# Altium PCB NB3000XN.PcbDoc (part 23 of 71)
Units mil, origin at the board's own origin, x right, y up, seen from the top; angles counter-clockwise.
Board outline 9527.56 x 6929.77 mil, 6 copper layers (Top Layer, GND+SHIELD, MidLayer1, MidLayer2, P2 - 3V3+5V0, Bottom Layer), stack 62.375 mil thick; 832 components, 1027 nets, 4655 pads, 4981 vias.
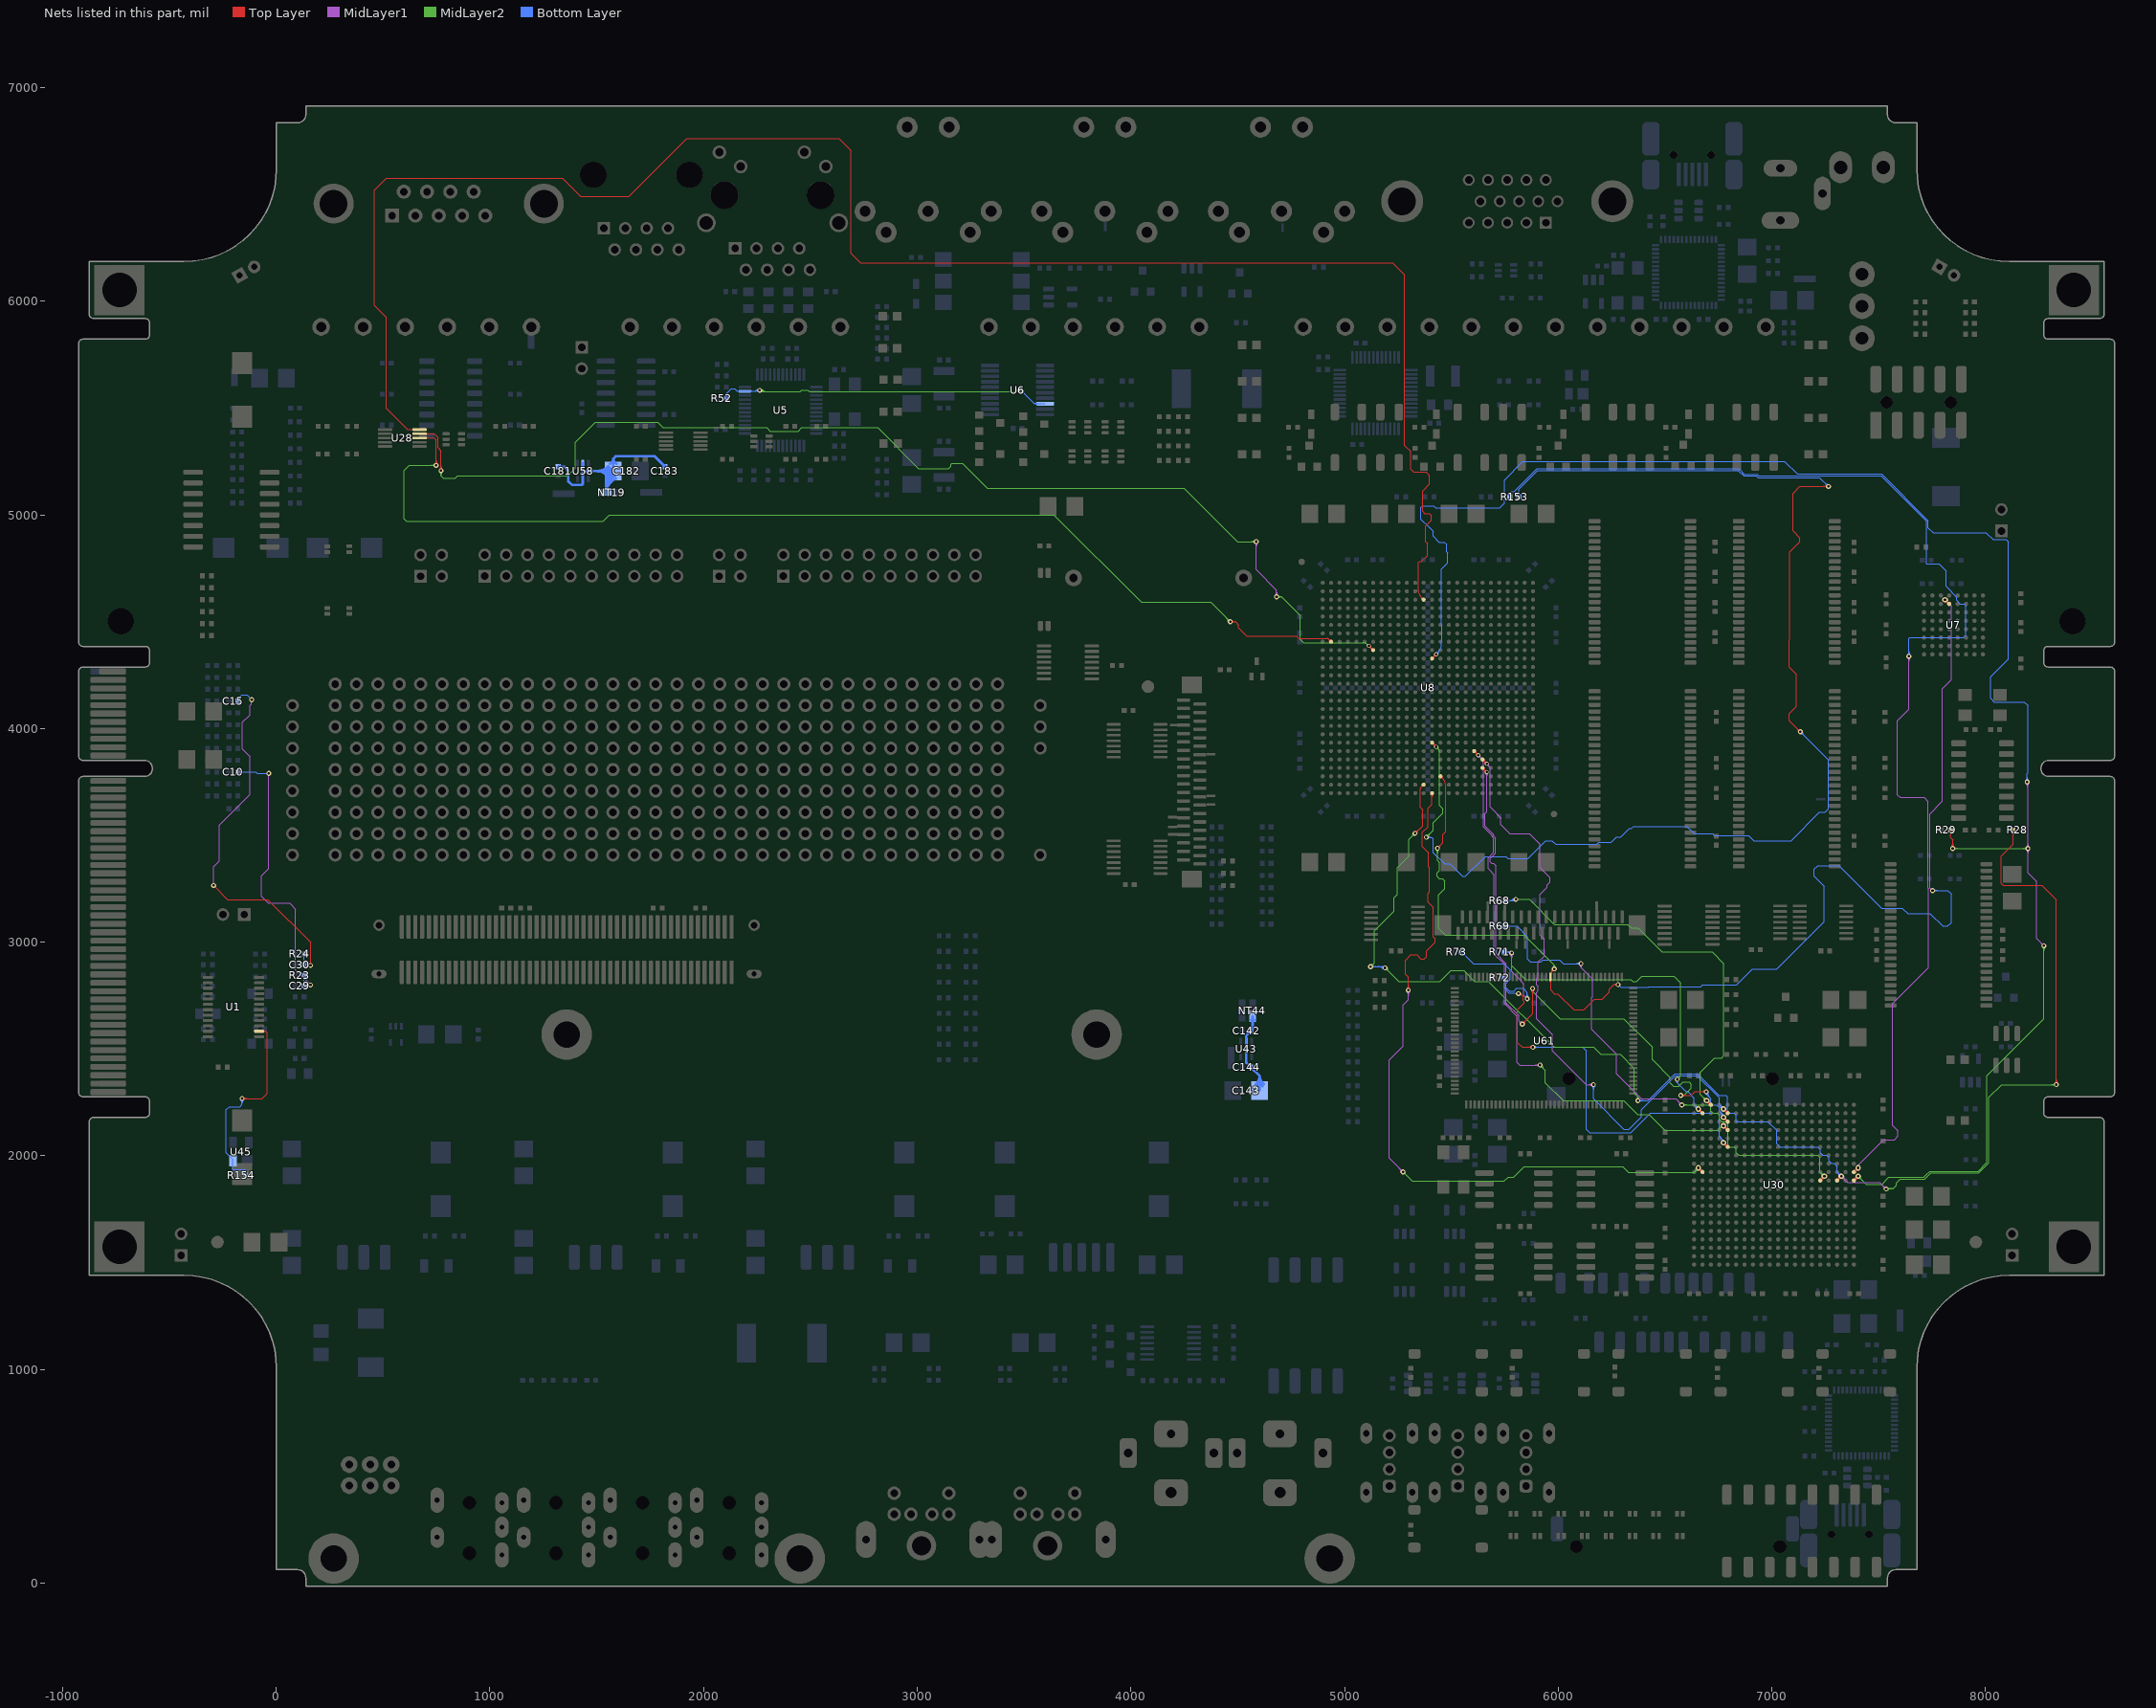
[diagram p27: the nets of this part, all layers, seen from the top]

## Via types
v1: diameter 23, hole 11.81, Top Layer to Bottom Layer, 3672 vias
v2: diameter 26, hole 11.81, Top Layer to Bottom Layer, 461 vias
v3: diameter 19, hole 11.81, Top Layer to Bottom Layer, tented both sides, 396 vias
v4: diameter 23.62, hole 11.81, Top Layer to Bottom Layer, 288 vias
v5: diameter 20, hole 11.81, Top Layer to Bottom Layer, 91 vias
v6: diameter 23, hole 11.81, Top Layer to Bottom Layer, tented both sides, 50 vias
v7: diameter 31, hole 11.81, Top Layer to Bottom Layer, 15 vias
v8: diameter 27.56, hole 11.81, Top Layer to Bottom Layer, tented both sides, 4 vias
v9: diameter 29, hole 11.81, Top Layer to Bottom Layer, 3 vias
v10: diameter 21, hole 11.81, Top Layer to Bottom Layer, 1 vias

## Nets (pads, with @x,y where several pads share a name; then routed paths per layer and width w, separated by ;. In a path a pad name is that pad's centre, name@x,y a point inside that pad or via, vN(x,y) a via of type N, cw(c..) or ccw(c..) an arc to the next point about the centre after c; other vN are vias at no path point) (continued)
CODEC_AUD.L: C10.2 C29.1 R23.1 | length 1510.1
  MidLayer1 w4: v1(-35,3790) -35.7,3790 -35.81,3789.89 -35.81,3344.19 -69.25,3310.75 -69.25,3214.25 -37.69,3182.69 62.31,3182.69 90.19,3154.81 90.19,2870.71 v1(160.86,2800.04)
  Bottom Layer w4: C10.2@-179.33,3795.91 -95,3795.91 -89.09,3790 v1(-35,3790) ; C29.1@130.67,2795 C29.1@131.18,2795.51 ; R23.1@130.67,2844.49 R23.1@131.18,2845 C29.1@131.18,2795.51 ; C29.1@132.1,2793.89 cw(c144.6,2784.27) 144.6,2800.04 ; C29.1@135.27,2791.45 cw(c152.73,2778.01) v1@152.73,2800.04 ; C29.1@137.61,2801.94 ccw(c142.19,2806.52) C29.1@142.19,2800.04 ; C29.1@138.44,2789.01 cw(c160.86,2771.75) v1(160.86,2800.04) 135.71,2800.04 C29.1@131.18,2795.51 ; v1@154.14,2793.32 ccw(c137.92,2777.11) 137.92,2800.04 ccw(c137.92,2822.98) v1@154.14,2806.76 ; v1@156.97,2796.15 ccw(c147.58,2786.76) 147.58,2800.04 ccw(c147.58,2813.32) v1@156.97,2803.93
CODEC_AUD.R: C15.2 C30.1 R24.1 | length 1882
  Top Layer w4: v1(-293.14,3265.71) -227.44,3200 -40,3200 160.86,2999.14 v1(160.86,2891.71)
  MidLayer1 w4: v1(-293.14,3265.71) -293.14,3353.62 -266.31,3380.45 -266.31,3548.69 -122.48,3692.52 -122.48,3869.56 -138.29,3885.37 ; -138.66,3885.37 -157.48,3904.19 -157.48,4029.34 -123,4063.82 -123,4107.81 -116.52,4114.29 v1@-116.52,4135
  Bottom Layer w4: C15.2@-179.33,4128.64 -179.33,4138.55 -160.94,4156.94 -136.94,4156.94 v1(-115,4135) ; R24.1@130.67,2944.49 R24.1@131.18,2945 131.18,2895.51 C30.1@130.67,2895 ; C30.1@140.11,2895 cw(c140.11,2871.62) v1@156.91,2887.88 ; 145.87,2895 ccw(c145.87,2906.69) v1@154.14,2898.43 ; 149.55,2895 cw(c149.55,2880.76) v1@159.78,2890.66 ; v1@154.03,2885.1 ccw(c130.67,2862.49) C30.1@130.67,2895 ; v1(160.86,2891.71) 157.56,2895 C30.1@130.67,2895
CODEC_RST: R154.1 U1.14 U45.2 | length 1071.8
  Top Layer w4: v1(-159.81,2268.37) -66.63,2268.37 -43.14,2291.86 -43.14,2575.03 -51.14,2583.03 U1.14@-79.84,2583.03 ; v1@-155.92,2264.49 cw(c-146.53,2255.1) -146.53,2268.37 cw(c-146.53,2281.65) v1@-155.92,2272.26 ; v1@-153.09,2261.66 cw(c-136.87,2245.44) -136.87,2268.37 cw(c-136.87,2291.31) v1@-153.09,2275.09 ; U1.14@-60.1,2579.43 cw(c-51.42,2570.75) -51.42,2583.03 cw(c-51.42,2595.31) U1.14@-60.1,2586.63
  Bottom Layer w4: v1@-166.53,2261.66 cw(c-182.74,2245.44) -159.81,2245.44 cw(c-136.87,2245.44) v1@-153.09,2261.66 ; v1@-163.7,2264.49 cw(c-173.09,2255.1) -159.81,2255.1 cw(c-146.53,2255.1) v1@-155.92,2264.49 ; v1(-159.81,2268.37) -159.81,2240 -169.81,2230 -220,2230 -235,2215 -235,2015 -202.85,1982.85 U45.2@-202.85,1976.69 -202.85,1937.85 -200,1935 -146.32,1935 -141.32,1930 R154.1@-141.32,1910
COMA: C142.1 C143.2 C144.1 NT44.2 U43.2 | length 667.1
  Bottom Layer w12: C144.1@4555.84,2415 ccw(c4541.81,2415) 4551.73,2424.92 ccw(c4561.65,2434.84) C144.1@4561.65,2420.81 ; C142.1@4555.84,2585 cw(c4541.81,2585) 4551.73,2575.08 cw(c4561.65,2565.16) C142.1@4561.65,2579.19 ; C142.1@4557.54,2589.11 ccw(c4528.04,2618.61) 4569.76,2618.61 ; C144.1@4561.65,2409.19 cw(c4561.65,2395.16) 4571.57,2405.08 cw(c4581.49,2415) C144.1@4567.46,2415 ; NT44.2@4562.87,2636.75 cw(c4546.23,2620.11) 4569.76,2620.11 cw(c4593.3,2620.11) NT44.2@4576.66,2636.75 ; NT44.2@4569.76,2653.9 4569.76,2593.11 C142.1@4561.65,2585 4540,2563.35 U43.2@4540,2537.4 4540,2436.65 C144.1@4561.65,2415 4602.99,2373.66 ; C143.2@4583.64,2336.12 ccw(c4556.91,2373.66) 4602.99,2373.66 ; C143.2@4590.6,2326.35 ccw(c4573.48,2350.38) 4602.99,2350.38 ccw(c4632.5,2350.38) C143.2@4615.39,2326.35 ; C143.2@4602.99,2305 4602.99,2373.66 ; C143.2@4622.35,2336.12 cw(c4649.07,2373.66) 4602.99,2373.66
COMB: C181.1 C182.2 C183.1 NT19.2 U58.2 | length 1566.9
  Bottom Layer w12: C181.1@1320,5225.67 1349.33,5225.67 1366.58,5208.42 1366.58,5158.42 1385,5140 1430,5140 1435,5145 1435,5205 ; C181.1@1324.11,5221.56 cw(c1334.03,5211.64) 1334.03,5225.67 cw(c1334.03,5239.7) C181.1@1324.11,5229.78 ; U58.2@1435,5242.4 1435,5205 ; NT19.2@1537,5112.13 ccw(c1520.36,5128.77) 1543.9,5128.77 ccw(c1567.43,5128.77) NT19.2@1550.79,5112.13 ; NT19.2@1543.9,5099.52 cw(c1620.99,5099.52) C182.2@1590.64,5170.39 ; NT19.2@1543.9,5105.24 1543.9,5171.4 C182.2@1577.5,5205 ; NT19.2@1543.9,5117.71 cw(c1613.2,5117.71) C182.2@1585.91,5181.42 ; 1543.9,5135.91 cw(c1605.41,5135.91) C182.2@1581.19,5192.45 ; 1543.9,5154.1 cw(c1597.61,5154.1) C182.2@1576.46,5203.48 ; C182.2@1543.9,5172.3 cw(c1589.82,5172.3) C182.2@1571.74,5214.51 ; C182.2@1553.9,5181.4 ccw(c1496.94,5124.44) 1496.94,5205 ccw(c1496.94,5285.56) C182.2@1553.9,5228.6 ; C182.2@1562.39,5189.89 ccw(c1525.91,5153.41) 1525.91,5205 ccw(c1525.91,5256.59) C182.2@1562.39,5220.11 ; C182.2@1562.79,5238.89 ccw(c1551.2,5262.5) 1577.5,5262.5 ccw(c1603.8,5262.5) C182.2@1592.21,5238.89 ; C183.1@1814.19,5225.67 ccw(c1800.16,5225.67) 1810.08,5235.59 ccw(c1820,5245.51) C183.1@1820,5231.48 ; C183.1@1820,5225.67 1770.67,5275 1590,5275 1577.5,5262.5 C182.2@1577.5,5205 1435,5205
CRS_U: R52.1 U5.23 U6.8 | length 1968.1
  MidLayer2 w4: v1(2262.86,5583.71) 2269.06,5577.5 2452.25,5577.5 2459.27,5584.52 2488.69,5584.52 2495.71,5577.5 3478.65,5577.5 v1(3484.86,5583.71) ; v1@2263.92,5584.77 ccw(c2281.47,5602.32) 2281.47,5577.5 ; v1@2266.75,5587.6 ccw(c2291.12,5611.97) 2291.12,5577.5 ; v1@2269.57,5590.43 ccw(c2300.78,5621.63) 2300.78,5577.5 ; 3446.94,5577.5 ccw(c3446.94,5621.63) v1@3478.14,5590.43 ; 3456.59,5577.5 ccw(c3456.59,5611.97) v1@3480.97,5587.6 ; 3466.25,5577.5 ccw(c3466.25,5602.32) v1@3483.8,5584.77
  Bottom Layer w4: R52.1@2100.04,5552.5 ccw(c2088.21,5566.03) 2106.18,5566.03 ; R52.1@2102.68,5549.49 ccw(c2095.92,5557.22) 2106.18,5557.22 ccw(c2116.44,5557.21) R52.1@2109.68,5549.49 ; R52.1@2106.18,5545 2106.18,5566.03 ; R52.1@2112.32,5552.5 cw(c2124.16,5566.03) 2106.18,5566.03 ; U5.23@2167.19,5575.75 ccw(c2160.36,5568.93) 2160.36,5578.58 ccw(c2160.36,5588.24) U5.23@2167.19,5581.41 ; U5.23@2219.9,5575.75 cw(c2226.73,5568.93) 2226.73,5578.58 cw(c2226.73,5588.24) U5.23@2219.9,5581.41 ; 2227.55,5578.58 ccw(c2227.55,5619.02) v1@2256.14,5590.43 ; 2237.21,5578.58 ccw(c2237.21,5609.36) v1@2258.97,5587.6 ; 2246.86,5578.58 ccw(c2246.86,5599.7) v1@2261.8,5584.77 ; 2252.29,5578.58 cw(c2252.29,5573.15) v1@2256.14,5576.99 ; v1(2262.86,5583.71) 2257.73,5578.58 U5.23@2193.54,5578.58 2156.86,5578.58 2145.4,5590.04 2130.19,5590.04 2106.18,5566.03 ; v1@3484.86,5574.21 cw(c3484.86,5551.27) 3501.07,5567.49 cw(c3517.29,5583.71) v1@3494.36,5583.71 ; v1@3484.86,5578.21 cw(c3484.86,5564.93) 3494.25,5574.32 cw(c3503.64,5583.71) v1@3490.36,5583.71 ; v1(3484.86,5583.71) 3547.54,5521.02 U6.8@3598.94,5521.02 ; U6.8@3560.62,5516.17 ccw(c3548.91,5504.47) 3548.91,5521.02 ccw(c3548.92,5537.58) U6.8@3560.62,5525.87
DAC.CLK: U8.C13 U28.10 | length 8540.9
  Top Layer w4: U28.10@640.42,5396.54 ccw(c633.59,5389.71) 633.59,5399.37 ccw(c633.59,5409.03) U28.10@640.42,5402.2 ; U28.10@670.71,5399.37 615,5399.37 515,5499.37 515,5925 460,5980 460,6520 515,6575 1340,6575 1425,6490 1650,6490 1922,6762 2633,6762 2690,6705 2690,6225 2735,6180 5225,6180 5281.86,6123.14 5281.86,5325.04 5309.86,5297.04 5309.86,5294 ; 5309.86,5250.04 5309.86,5294 ; U8.C13@5362.97,4603.39 ccw(c5345.25,4603.39) 5357.78,4615.92 ; U8.C13@5370.31,4610.73 cw(c5370.31,4628.45) 5357.78,4615.92 ; 5309.86,5294 5309.86,5214.14 5323.96,5200.04 5381.86,5200.04 5398.52,5183.37 5398.52,5145.71 5365.19,5112.37 5365.19,5016.71 5375.52,5006.37 5398.52,5006.37 5406.86,4998.04 5406.86,4975.04 5379.19,4947.37 5379.19,4875.04 5387.5,4866.73 5387.5,4810.06 5360.44,4783 5350,4783 5346.45,4779.45 5346.45,4773 5346.45,4724.74 5346.45,4720 5346.45,4710 5346.45,4643.27 ccw(c5385.13,4643.27) 5357.78,4615.92
DAC.CS: U8.J7 U28.9 | length 5946.3
  Top Layer w4: U28.9@670.71,5379.69 740.31,5379.69 756.86,5363.14 756.86,5314.71 771.52,5300.04 v1(771.52,5207.37) ; U28.9@701,5376.86 cw(c707.83,5370.03) 707.83,5379.69 cw(c707.83,5389.34) U28.9@701,5382.51 ; v1@764.81,5214.09 ccw(c748.59,5230.31) 771.52,5230.31 ccw(c794.46,5230.31) v1@778.24,5214.09 ; v1@767.64,5211.26 ccw(c758.25,5220.65) 771.52,5220.65 ccw(c784.8,5220.65) v1@775.41,5211.26 ; v3(5114.41,4386.85) U8.J7@5134.09,4367.17 ; U8.J7@5126.59,4367.17 ccw(c5108.49,4367.17) 5121.29,4379.97 ccw(c5134.09,4392.77) U8.J7@5134.09,4374.67 ; U8.J7@5126.75,4367.17 ccw(c5109.03,4367.17) 5121.56,4379.7 ccw(c5134.09,4392.23) U8.J7@5134.09,4374.51 ; 5127.21,4374.05 ccw(c5114.41,4361.24) 5114.41,4379.35 cw(c5114.41,4361.24) 5127.21,4374.05 ; 5127.21,4374.05 cw(c5140.02,4386.85) 5121.91,4386.85 ccw(c5140.02,4386.85) 5127.21,4374.05
  MidLayer1 w4: v1@4580.14,4868.32 cw(c4563.92,4852.11) 4586.86,4852.11 cw(c4609.79,4852.11) v1@4593.57,4868.32 ; v1@4582.97,4871.15 cw(c4573.58,4861.76) 4586.86,4861.76 cw(c4600.14,4861.76) v1@4590.75,4871.15 ; v1(4586.86,4875.04) 4586.86,4743.39 4681.86,4648.39 v1(4681.86,4616.71) ; v1@4675.14,4623.43 ccw(c4658.92,4639.64) 4681.86,4639.64 ccw(c4704.79,4639.64) v1@4688.57,4623.43 ; v1@4677.97,4620.6 ccw(c4668.58,4629.99) 4681.86,4629.99 ccw(c4695.14,4629.99) v1@4685.75,4620.6
  MidLayer2 w4: v1@764.81,5200.66 cw(c748.59,5184.44) 771.52,5184.44 cw(c794.46,5184.44) v1@778.24,5200.66 ; v1@767.64,5203.49 cw(c758.25,5194.1) 771.52,5194.1 cw(c784.8,5194.1) v1@775.41,5203.49 ; v1(771.52,5207.37) 771.52,5183.48 782.72,5172.28 837.28,5172.28 848.71,5183.71 1365.02,5183.71 1400,5218.69 1400,5340.2 1493.5,5433.71 1786.29,5433.71 1810,5410 2294.81,5410 2312.62,5392.19 2443.04,5392.19 2459.39,5408.54 2815.03,5408.54 3006.38,5217.19 3147.38,5217.19 3157.81,5227.62 3157.81,5235.84 3163.68,5241.71 3211.98,5241.71 3328.65,5125.04 4248.52,5125.04 4498.52,4875.04 v1(4586.86,4875.04) ; v1@4580.14,4868.32 ccw(c4563.92,4852.11) 4563.92,4875.04 ccw(c4563.92,4897.98) v1@4580.14,4881.76 ; v1@4582.97,4871.15 ccw(c4573.58,4861.76) 4573.58,4875.04 ccw(c4573.58,4888.32) v1@4582.97,4878.93 ; v1(4681.86,4616.71) 4705.19,4616.71 4770.79,4551.11 4792,4529.9 4792,4418 4807.64,4402.36 4860,4402.36 4870,4402.36 4997.36,4402.36 5090.9,4402.36 cw(c5090.9,4388.31) 5100.83,4398.24 ; v1@4685.75,4612.82 cw(c4695.14,4603.43) 4695.14,4616.71 cw(c4695.14,4629.99) v1@4685.75,4620.6 ; v1@4688.57,4609.99 cw(c4704.79,4593.77) 4704.79,4616.71 cw(c4704.79,4639.64) v1@4688.57,4623.43 ; v3@5106.94,4386.2 ccw(c5088.9,4384.62) 5100.54,4398.49 ccw(c5112.18,4412.36) v3@5113.76,4394.32
DAC.DIN: U8.H2 U28.8 | length 5482.2
  Top Layer w4: U28.8@698.18,5360 U28.8@676.2,5360 ; U28.8@701,5357.17 cw(c707.83,5350.34) 707.83,5360 cw(c707.83,5369.66) U28.8@701,5362.83 ; v1@741.81,5238.76 ccw(c725.59,5254.98) 748.52,5254.98 ccw(c771.46,5254.98) v1@755.24,5238.76 ; v1@744.64,5235.93 ccw(c735.25,5245.32) 748.52,5245.32 ccw(c761.8,5245.32) v1@752.41,5235.93 ; v1(748.52,5232.04) 748.52,5351.48 740,5360 U28.8@676.2,5360 ; v1(4465.19,4500.04) 4489.96,4500.04 4505,4485 4505,4471.31 4542.44,4433.87 4759,4433.87 4774.01,4433.87 4785.84,4422.04 4790.84,4422.04 4801,4422.04 4860,4422.04 4870,4422.04 4917.53,4422.04 cw(c4917.53,4411.89) 4924.71,4419.07 ; v1@4469.08,4496.15 cw(c4478.47,4486.76) 4478.47,4500.04 cw(c4478.47,4513.32) v1@4469.08,4503.93 ; v1@4471.91,4493.32 cw(c4488.13,4477.11) 4488.13,4500.04 cw(c4488.13,4522.98) v1@4471.91,4506.76 ; U8.H2@4929.9,4406.54 ccw(c4912.17,4406.54) 4924.71,4419.07 ; U8.H2@4937.24,4413.88 cw(c4937.24,4431.6) 4924.71,4419.07 ; U28.8@676.2,5360 U28.8@670.71,5360 U28.8@676.2,5360
  MidLayer2 w4: v1@741.81,5225.32 ccw(c725.59,5209.11) 725.59,5232.04 ccw(c725.59,5254.98) v1@741.81,5238.76 ; v1@744.64,5228.15 ccw(c735.25,5218.76) 735.25,5232.04 ccw(c735.25,5245.32) v1@744.64,5235.93 ; v1(748.52,5232.04) 622.04,5232.04 598.52,5208.52 598.52,4981.48 610,4970 1530,4970 1560.04,5000.04 1635,5000.04 3625,5000 ; 3620,5000 3625,5000 ; v1@4455.69,4500.04 ccw(c4432.76,4500.04) 4448.97,4516.26 ccw(c4465.19,4532.48) v1@4465.19,4509.54 ; v1@4459.69,4500.04 ccw(c4446.41,4500.04) 4455.8,4509.43 ccw(c4465.19,4518.82) v1@4465.19,4505.54 ; v1(4465.19,4500.04) 4373.52,4591.71 4048.52,4591.71 3640.23,5000 3625,5000
DB_CLK1: R153.1 U30.A9 | length 6069
  Top Layer w8: U30.A9@7384.02,1924.06 v2(7403.7,1943.74) ; U30.A9@7384.02,1929.9 ccw(c7384.02,1944) 7393.99,1934.03 ccw(c7403.96,1924.06) U30.A9@7389.86,1924.06 ; v2@7394.7,1943.74 cw(c7372.97,1943.74) 7388.34,1928.38 cw(c7403.7,1913.01) v2@7403.7,1934.74
  MidLayer1 w4: v2(7403.7,1943.74) 7403.7,1956.98 7405.46,1958.74 7407.22,1958.74 7523.52,2075.04 7573.52,2075.04 7590.19,2091.71 7590.19,2116.71 7565.19,2141.71 7565.19,2713.73 7732.52,2881.06 7732.52,3251.42 7731.86,3252.09 7731.86,3658.14 7712.35,3677.65 7600.23,3677.65 7588.29,3689.59 7588.29,4036.76 7641.52,4090 v1(7641.52,4338.37) ; v1@7634.81,4331.66 cw(c7618.59,4315.44) 7641.52,4315.44 cw(c7664.46,4315.44) v1@7648.24,4331.66 ; v1@7637.64,4334.49 cw(c7628.25,4325.1) 7641.52,4325.1 cw(c7654.8,4325.1) v1@7645.41,4334.49
  Bottom Layer w4: R153.1@5769.77,5093.89 ccw(c5766.66,5100.34) 5773.82,5100.34 ; R153.1@5773.82,5085 5773.82,5100.34 ; R153.1@5777.87,5093.89 cw(c5780.98,5100.34) 5773.82,5100.34 ; v1@7634.81,4345.09 ccw(c7618.59,4361.31) 7641.52,4361.31 ccw(c7664.46,4361.31) v1@7648.24,4345.09 ; v1@7637.64,4342.26 ccw(c7628.25,4351.65) 7641.52,4351.65 ccw(c7654.8,4351.65) v1@7645.41,4342.26 ; v1(7641.52,4338.37) 7641.52,4421.37 7645.52,4425.37 7896.52,4425.37 7908.52,4437.37 7908.52,4575.04 7900.19,4583.37 7881.86,4583.37 7865.19,4600.04 7865.19,4615.04 7815.19,4665.04 7815.19,4736.71 7781.86,4770.04 7725.19,4770.04 7723.52,4771.71 7723.52,4970.71 7510.86,5183.37 6938.43,5183.37 6931.09,5190.71 6871.8,5190.71 6845.8,5216.71 5965,5216.71 5901.71,5216.71 5793.37,5108.37 5781.86,5108.37 5773.82,5100.34
DB_CLOCKS.FPGA_CLK: R28.1 U8.AE13 U30.C10 | length 7750.4
  Top Layer w4: v1(5330,3510) v1@5330.1,3509.9 ; v1@5330,3515.5 ccw(c5330,3529.27) 5339.73,3519.53 ; v1@5330,3519.5 ccw(c5330,3542.92) 5346.56,3526.36 ; v1@5333.05,3509.9 v1@5330.1,3509.9 ; v1@5335.5,3510 cw(c5348.29,3510) 5339.25,3519.04 ; v1@5339.5,3510 cw(c5361.95,3510) 5346.07,3525.87 ; U8.AE13@5362.97,3737.24 cw(c5345.25,3737.24) 5357.78,3724.71 ; U8.AE13@5370.31,3729.9 ccw(c5370.31,3712.17) 5357.78,3724.71 ; R28.1@8122.23,3517.92 cw(c8106.32,3502.01) 8128.82,3502.01 cw(c8151.32,3502.01) R28.1@8135.41,3517.92 ; R28.1@8125.06,3520.75 cw(c8115.98,3511.67) 8128.82,3511.67 cw(c8141.66,3511.67) R28.1@8132.58,3520.75 ; R28.1@8128.82,3525 8128.82,3458.37 8073.52,3403.08 8073.52,3275.04 8081.56,3267 8263,3267 8331.86,3198.14 v1(8331.86,2333.37) ; v1@8325.14,2340.09 ccw(c8308.92,2356.31) 8331.86,2356.31 ccw(c8354.79,2356.31) v1@8338.57,2340.09 ; v1@8327.97,2337.26 ccw(c8318.58,2346.65) 8331.86,2346.65 ccw(c8345.14,2346.65) v1@8335.75,2337.26 ; v1@5330.1,3509.9 5365.19,3544.99 5365.19,3619.81 5354.81,3630.19 5354.81,3660 5354.81,3670 5354.81,3717.53 cw(c5364.96,3717.53) 5357.78,3724.71
  Top Layer w8: U30.C10@7305.28,1884.68 v2(7324.96,1904.37) ; U30.C10@7305.28,1890.53 ccw(c7305.28,1904.63) 7315.25,1894.66 ccw(c7325.22,1884.68) U30.C10@7311.12,1884.68 ; v2@7315.96,1904.37 cw(c7294.23,1904.37) 7309.6,1889.01 cw(c7324.96,1873.64) v2@7324.96,1895.37
  MidLayer1 w4: v2@7324.96,1893.37 cw(c7324.96,1866.81) 7343.74,1885.59 cw(c7362.52,1904.37) v2@7335.96,1904.37 ; v2@7324.96,1897.37 cw(c7324.96,1880.47) 7336.91,1892.42 cw(c7348.86,1904.37) v2@7331.96,1904.37 ; v2(7324.96,1904.37) 7354.29,1875.04 7504.96,1875.04 v1(7535,1845) v1@7536.9,1845 ; v1@7525.5,1845 ccw(c7502.56,1845) 7518.78,1861.22 ccw(c7535,1877.43) v1@7535,1854.5 ; v1@7529.5,1845 ccw(c7516.22,1845) 7525.61,1854.39 ccw(c7535,1863.78) v1@7535,1850.5
  MidLayer2 w4: v4(5121.9,2885) 5140.52,2903.63 5140.52,3053.36 5231.86,3144.69 5231.86,3208.06 5247.86,3224.06 5247.86,3350.02 5301.19,3403.35 5301.19,3481.19 v1(5330,3510) v1@5325.82,3510 ; v4@5121.9,2890.81 ccw(c5121.9,2904.84) 5131.82,2894.92 ccw(c5141.74,2885) v4@5127.71,2885 ; v4@5121.9,2894.81 ccw(c5121.9,2918.5) 5138.65,2901.75 ccw(c5155.39,2885) v4@5131.71,2885 ; v4@5190,2870.19 cw(c5190,2846.5) 5206.75,2863.25 cw(c5223.5,2880) v4@5199.81,2880 ; v4@5190,2874.19 cw(c5190,2860.16) 5199.92,2870.08 cw(c5209.84,2880) v4@5195.81,2880 ; v4(5190,2880) 5254.13,2815.87 5446.44,2815.87 5497.2,2866.63 5557.97,2866.63 5607.9,2816.71 5673.52,2816.71 5981.86,2508.37 6165.19,2508.37 6198.52,2475.04 6290.19,2475.04 6356.86,2408.37 6356.86,2291.71 6373.52,2275.04 ; v1@5320.5,3510 cw(c5297.56,3510) 5313.78,3493.78 cw(c5330,3477.56) v1@5330,3500.5 ; v1@5324.5,3510 cw(c5311.22,3510) 5320.61,3500.61 cw(c5330,3491.22) v1@5330,3504.5 ; v1@6368.68,2266.55 ccw(c6363.66,2275.04) 6373.52,2275.04 ; v1(6373.52,2258.37) 6373.52,2275.04 ; v1@6378.36,2266.55 cw(c6383.39,2275.04) 6373.52,2275.04 ; v1(7535,1845) 7537.19,1847.19 7567.38,1847.19 7582.5,1862.31 7582.5,1872.25 7601.75,1891.5 7714.94,1891.5 7743.44,1920 ; v1@7538.89,1841.11 cw(c7553.56,1826.44) 7553.56,1847.19 ; v1@7541.72,1838.28 cw(c7563.22,1816.78) 7563.22,1847.19 ; v1@7541.72,1851.72 ccw(c7552.65,1862.65) 7552.65,1847.19 ; 7734.85,1911.41 7743.44,1920 ; v1@8325.14,2326.66 ccw(c8308.92,2310.44) 8308.92,2333.37 ccw(c8308.92,2356.31) v1@8325.14,2340.09 ; v1@8327.97,2329.49 ccw(c8318.58,2320.1) 8318.58,2333.37 ccw(c8318.58,2346.65) v1@8327.97,2337.26 ; v1(8331.86,2333.37) 8075.19,2333.37 8015.19,2273.37 8015.19,1966.71 7973.52,1925.04 7968.48,1920 7743.44,1920
  Bottom Layer w4: v4(5121.9,2885) 5185,2885 v4(5190,2880) ; v4@5126.01,2880.89 cw(c5135.93,2870.97) 5135.93,2885 cw(c5135.93,2899.03) v4@5126.01,2889.11 ; v4@5128.84,2878.06 cw(c5145.58,2861.31) 5145.58,2885 cw(c5145.58,2908.69) v4@5128.84,2891.94 ; 5154.24,2885 cw(c5154.24,2844.24) v4@5183.06,2873.06 ; 5163.9,2885 cw(c5163.9,2853.9) v4@5185.89,2875.89 ; 5173.56,2885 cw(c5173.56,2863.56) v4@5188.72,2878.72 ; 5178.39,2885 ccw(c5178.39,2891.61) v4@5183.06,2886.94 ; v1(6373.52,2258.37) 6410,2258.37 6415.19,2258.37 6420.54,2258.37 6546.21,2384.04 6605,2384.04 6651.8,2384.04 6752.46,2283.37 6785.19,2283.37 6793.52,2275.04 6793.52,2208.37 6801.86,2200.04 6823.86,2200.04 6832.19,2191.71 6832.19,2163.37 6835.19,2160.37 6981.86,2160.37 7023.52,2118.71 7023.52,2056.04 7037.86,2041.71 7214.49,2041.71 7227.22,2028.98 7227.22,2014.61 7238.35,2003.48 7256.52,2003.48 7266.59,1993.41 7266.59,1975.24 7277.72,1964.11 7292.09,1964.11 7305.96,1950.24 7305.96,1923.37 v2(7324.96,1904.37) v2@7323.52,1904.37 ; v1@6377.41,2254.49 cw(c6386.8,2245.1) 6386.8,2258.37 cw(c6386.8,2271.65) v1@6377.41,2262.26 ; v1@6380.24,2251.66 cw(c6396.46,2235.44) 6396.46,2258.37 cw(c6396.46,2281.31) v1@6380.24,2265.09 ; v2@7313.96,1904.37 ccw(c7287.4,1904.37) 7306.18,1923.15 ccw(c7324.96,1941.93) v2@7324.96,1915.37 ; v2@7317.96,1904.37 ccw(c7301.06,1904.37) 7313.01,1916.32 ccw(c7324.96,1928.27) v2@7324.96,1911.37
DB_CLOCKS.FPGA_CLK1: R153.2 U8.Y14 | length 6566.3
  Top Layer w4: U8.Y14@5409.69,3926.59 cw(c5409.69,3908.49) 5422.49,3921.29 cw(c5435.29,3934.09) U8.Y14@5417.19,3934.09 ; U8.Y14@5409.69,3926.75 cw(c5409.69,3909.03) 5422.22,3921.56 cw(c5434.75,3934.09) U8.Y14@5417.03,3934.09 ; U8.Y14@5409.69,3934.09 v3(5429.37,3914.41) ; v1@7124.02,3985.04 ccw(c7101.09,3985.04) 7117.31,4001.26 ccw(c7133.52,4017.48) v1@7133.52,3994.54 ; v1@7128.02,3985.04 ccw(c7114.75,3985.04) 7124.14,3994.43 ccw(c7133.52,4003.82) v1@7133.52,3990.54 ; v1(7133.52,3985.04) 7081.86,4036.71 7081.86,4070.04 7115.19,4103.37 7115.19,4253.39 7081.86,4286.73 7081.86,4413.71 7084.86,4416.71 7084.86,4827.04 7131.86,4874.04 7131.86,4891.71 7098.52,4925.04 7098.52,5100.04 7131.86,5133.37 v1(7265.19,5133.37) ; v1@7258.47,5126.66 ccw(c7242.26,5110.44) 7242.26,5133.37 ccw(c7242.26,5156.31) v1@7258.47,5140.09 ; v1@7261.3,5129.49 ccw(c7251.91,5120.1) 7251.91,5133.37 ccw(c7251.91,5146.65) v1@7261.3,5137.26 ; 5416.57,3927.21 cw(c5403.76,3914.41) 5421.87,3914.41 ccw(c5403.76,3914.41) 5416.57,3927.21 ; 5416.57,3927.21 ccw(c5429.37,3940.02) 5429.37,3921.91 cw(c5429.37,3940.02) 5416.57,3927.21
  MidLayer2 w4: v1(5382.2,3491.11) 5415,3523.91 5415,3560 5460,3605 5460,3625 5444.88,3640.12 5444.88,3660 5444.88,3670 5444.88,3797.36 5444.88,3890.9 ccw(c5430.83,3890.9) 5440.76,3900.83 ; v1@5382.2,3496.61 ccw(c5382.2,3509.89) 5391.59,3500.5 ccw(c5400.98,3491.11) v1@5387.7,3491.11 ; v1@5382.2,3500.61 ccw(c5382.2,3523.55) 5398.42,3507.33 ccw(c5414.64,3491.11) v1@5391.7,3491.11 ; v3@5428.72,3906.94 cw(c5427.14,3888.9) 5441.01,3900.54 cw(c5454.88,3912.18) v3@5436.84,3913.76
  Bottom Layer w4: v1(5382.2,3491.11) 5408.89,3491.11 5415.86,3484.14 5415.86,3419.02 5468.5,3366.37 5493.63,3366.37 5551.63,3308.37 5566.19,3308.37 5651.78,3393.96 5658.9,3401.08 5755.82,3401.08 5765.19,3391.71 5857.98,3391.71 5941.31,3475.04 5970.86,3475.04 5987.86,3458.04 6181.86,3458.04 6190.52,3466.71 6248.52,3466.71 6273.52,3491.71 6294.17,3491.71 6334.17,3531.71 6343.31,3531.71 6353.98,3542.37 6603.21,3542.37 6637.21,3508.37 6722.54,3508.37 6730.88,3500.04 6890.19,3500.04 6915.19,3475.04 7090.19,3475.04 7223.52,3608.37 7248.52,3608.37 7265.19,3625.04 7265.19,3853.37 v1(7133.52,3985.04) ; v1@5386.09,3487.22 cw(c5395.48,3477.83) 5395.48,3491.11 cw(c5395.48,3504.39) v1@5386.09,3495 ; v1@5388.92,3484.39 cw(c5405.14,3468.18) 5405.14,3491.11 cw(c5405.14,3514.05) v1@5388.92,3497.83 ; R153.2@5809.59,5092.08 ccw(c5793.68,5107.99) 5816.18,5107.99 ccw(c5838.68,5107.99) R153.2@5822.77,5092.08 ; R153.2@5812.42,5089.25 ccw(c5803.34,5098.33) 5816.18,5098.33 ccw(c5829.02,5098.33) R153.2@5819.94,5089.25 ; R153.2@5816.18,5085 5816.18,5119.87 5904.69,5208.37 6842.82,5208.37 6868.48,5182.71 6927.78,5182.71 6935.45,5175.04 7223.52,5175.04 v1(7265.19,5133.37) ; v1@7133.52,3975.54 cw(c7133.52,3952.61) 7149.74,3968.82 cw(c7165.96,3985.04) v1@7143.02,3985.04 ; v1@7133.52,3979.54 cw(c7133.52,3966.26) 7142.91,3975.65 cw(c7152.3,3985.04) v1@7139.02,3985.04 ; v1@7255.69,5133.37 ccw(c7232.76,5133.37) 7248.97,5149.59 ccw(c7265.19,5165.81) v1@7265.19,5142.87 ; v1@7259.69,5133.37 ccw(c7246.41,5133.37) 7255.8,5142.76 ccw(c7265.19,5152.15) v1@7265.19,5138.87
DB_CLOCKS.REF_CLK: R29.1 U8.K14 U30.A10 | length 9087.7
  Top Layer w4: U8.K14@5409.69,4327.8 v3(5429.37,4347.48) ; U8.K14@5409.69,4335.14 ccw(c5409.69,4352.86) 5422.22,4340.33 ccw(c5434.75,4327.8) U8.K14@5417.03,4327.8 ; U8.K14@5409.69,4335.3 ccw(c5409.69,4353.4) 5422.49,4340.6 ccw(c5435.29,4327.8) U8.K14@5417.19,4327.8 ; R29.1@7829.59,3517.92 cw(c7813.68,3502.01) 7836.18,3502.01 cw(c7858.68,3502.01) R29.1@7842.77,3517.92 ; R29.1@7832.42,3520.75 cw(c7823.34,3511.67) 7836.18,3511.67 cw(c7849.02,3511.67) R29.1@7839.94,3520.75 ; R29.1@7836.18,3525 7836.18,3490 7846.52,3479.66 v1(7846.52,3438.37) ; v1@7839.81,3445.09 ccw(c7823.59,3461.31) 7846.52,3461.31 ccw(c7869.46,3461.31) v1@7853.24,3445.09 ; v1@7842.64,3442.26 ccw(c7833.25,3451.65) 7846.52,3451.65 ccw(c7859.8,3451.65) v1@7850.41,3442.26 ; 5416.57,4334.68 cw(c5429.37,4321.87) 5429.37,4339.98 ccw(c5429.37,4321.87) 5416.57,4334.68 ; 5416.57,4334.68 ccw(c5403.76,4347.48) 5421.87,4347.48 cw(c5403.76,4347.48) 5416.57,4334.68
  Top Layer w8: U30.A10@7384.02,1884.68 v2(7403.7,1904.37) ; U30.A10@7384.02,1890.53 ccw(c7384.02,1904.63) 7393.99,1894.66 ccw(c7403.96,1884.68) U30.A10@7389.86,1884.68 ; v2@7394.7,1904.37 cw(c7372.97,1904.37) 7388.34,1889.01 cw(c7403.7,1873.64) v2@7403.7,1895.37
  MidLayer1 w4: v1@8188.28,3743.28 cw(c8163.56,3718.56) 8198.52,3718.56 ; v1@8191.11,3746.11 cw(c8173.21,3728.21) 8198.52,3728.21 ; v1@8191.81,3431.66 cw(c8175.59,3415.44) 8198.52,3415.44 cw(c8221.46,3415.44) v1@8205.24,3431.66 ; v1@8191.81,3445.09 ccw(c8175.59,3461.31) 8198.52,3461.31 ccw(c8221.46,3461.31) v1@8205.24,3445.09 ; v1@8193.94,3748.94 cw(c8182.87,3737.87) 8198.52,3737.87 ; v1@8194.64,3434.49 cw(c8185.25,3425.1) 8198.52,3425.1 cw(c8211.8,3425.1) v1@8202.41,3434.49 ; v1@8194.64,3442.26 ccw(c8185.25,3451.65) 8198.52,3451.65 ccw(c8211.8,3451.65) v1@8202.41,3442.26 ; v1(8195,3750) 8196.9,3750 8198.52,3748.37 v1(8198.52,3438.37) 8198.52,3325.04 8240.19,3283.37 8240.19,3016.71 v1(8273.52,2983.37) ; 8198.52,3735.57 cw(c8209.43,3735.57) v1@8201.72,3743.28 ; v1@8264.02,2983.37 ccw(c8241.09,2983.37) 8257.31,2999.59 ccw(c8273.52,3015.81) v1@8273.52,2992.87 ; v1@8268.02,2983.37 ccw(c8254.75,2983.37) 8264.13,2992.76 ccw(c8273.52,3002.15) v1@8273.52,2988.87
  MidLayer2 w4: v2@7403.7,1893.37 cw(c7403.7,1866.81) 7422.48,1885.59 cw(c7441.26,1904.37) v2@7414.7,1904.37 ; v2@7403.7,1897.37 cw(c7403.7,1880.47) 7415.65,1892.42 cw(c7427.6,1904.37) v2@7410.7,1904.37 ; v2(7403.7,1904.37) 7441.36,1866.71 7515.19,1866.71 7547.98,1899.5 7711.63,1899.5 7724.81,1912.68 7740.13,1928 7965.17,1928 8007.19,1970.02 8007.19,2375.37 8273.52,2641.71 v1(8273.52,2983.37) ; v1(7846.52,3438.37) v1(8198.52,3438.37) ; v1@7850.41,3434.49 cw(c7859.8,3425.1) 7859.8,3438.37 cw(c7859.8,3451.65) v1@7850.41,3442.26 ; v1@7853.24,3431.66 cw(c7869.46,3415.44) 7869.46,3438.37 cw(c7869.46,3461.31) v1@7853.24,3445.09 ; v1@8191.81,3431.66 ccw(c8175.59,3415.44) 8175.59,3438.37 ccw(c8175.59,3461.31) v1@8191.81,3445.09 ; v1@8194.64,3434.49 ccw(c8185.25,3425.1) 8185.25,3438.37 ccw(c8185.25,3451.65) v1@8194.64,3442.26 ; v1@8266.81,2976.66 cw(c8250.59,2960.44) 8273.52,2960.44 cw(c8296.46,2960.44) v1@8280.24,2976.66 ; v1@8269.64,2979.49 cw(c8260.25,2970.1) 8273.52,2970.1 cw(c8286.8,2970.1) v1@8277.41,2979.49
  Bottom Layer w4: v3@5428.72,4354.95 ccw(c5427.14,4372.99) 5441.01,4361.35 ; v3@5436.84,4348.13 cw(c5454.88,4349.71) 5441.01,4361.35 ; v1@8188.28,3756.72 ccw(c8172.06,3772.93) 8195,3772.93 ccw(c8217.94,3772.93) v1@8201.72,3756.72 ; v1@8191.11,3753.89 ccw(c8181.72,3763.28) 8195,3763.28 ccw(c8208.28,3763.28) v1@8198.89,3753.89 ; v1@8196.9,3750 v1(8195,3750) 8195,3790 8198.52,3793.52 8198.52,4108.37 8181.86,4125.04 8040.19,4125.04 8023.52,4141.71 8023.52,4241.71 8106.86,4325.04 8106.86,4873.14 8095,4885 8035,4885 8002.62,4917.38 7754.48,4917.38 7731.86,4940 7731.86,4973.69 7514.17,5191.37 7118.63,5191.37 7059.96,5250.04 5835.04,5250.04 5748.52,5163.52 5748.52,5055 5727.23,5033.71 5426.69,5033.71 5417.35,5043.04 5365.19,5043.04 5356.86,5034.71 5356.86,4980.37 5394.34,4942.89 5414.69,4922.54 5414.69,4900.31 5442.19,4872.81 5467.38,4872.81 5477.81,4862.38 5477.81,4826.94 5482.5,4822.25 5482.5,4774.64 5453.23,4745.37 5453.23,4724.74 5453.23,4720 5453.23,4710 5453.23,4503.9 5453.23,4484.48 5453.23,4410.36 5453.23,4390.86 cw(c5411.5,4390.86) 5441.01,4361.35
DB_JTAG.HARD.TCK: R69.1 U30.E10 | length 2800.1
  Top Layer w8: U30.E10@7226.54,1884.68 v2(7246.22,1904.37) ; U30.E10@7226.54,1890.53 ccw(c7226.54,1904.63) 7236.51,1894.66 ccw(c7246.48,1884.68) U30.E10@7232.38,1884.68 ; v2@7237.22,1904.37 cw(c7215.49,1904.37) 7230.86,1889.01 cw(c7246.22,1873.64) v2@7246.22,1895.37
  MidLayer1 w4: v1@6100.95,2892.6 cw(c6091.26,2880.38) 6106.86,2880.38 ; v1(6106.86,2900.04) 6106.86,2880.38 ; v1@6112.76,2892.6 ccw(c6122.46,2880.38) 6106.86,2880.38 ; v1@6569.02,2238.37 ccw(c6546.09,2238.37) 6562.31,2254.59 ccw(c6578.52,2270.81) v1@6578.52,2247.87 ; v1@6573.02,2238.37 ccw(c6559.75,2238.37) 6569.13,2247.76 ccw(c6578.52,2257.15) v1@6578.52,2243.87 ; v1(6578.52,2238.37) 6550.19,2266.71 6390.19,2266.71 6273.52,2383.37 6273.52,2475.04 6156.86,2591.71 6156.86,2741.71 6160.52,2745.37 6160.52,2826.71 6106.86,2880.38
  MidLayer2 w4: v1(6578.52,2238.37) 6712.19,2238.37 6715.19,2235.37 6715.19,2208.37 6723.52,2200.04 6745.19,2200.04 6753.52,2191.71 6753.52,2171.37 6765.19,2159.71 6784.19,2159.71 6793.86,2150.04 6793.86,2050.04 6802.19,2041.71 6824.52,2041.71 6832.86,2033.37 6832.86,2015.27 6846.02,2002.11 7214.72,2002.11 7225.85,1990.98 7225.85,1924.74 v2(7246.22,1904.37) ; v1@6582.41,2234.49 cw(c6591.8,2225.1) 6591.8,2238.37 cw(c6591.8,2251.65) v1@6582.41,2242.26 ; v1@6585.24,2231.66 cw(c6601.46,2215.44) 6601.46,2238.37 cw(c6601.46,2261.31) v1@6585.24,2245.09 ; v2@7235.22,1904.37 ccw(c7208.66,1904.37) 7227.44,1923.15 ccw(c7246.22,1941.93) v2@7246.22,1915.37 ; v2@7239.22,1904.37 ccw(c7222.32,1904.37) 7234.27,1916.32 ccw(c7246.22,1928.27) v2@7246.22,1911.37
  Bottom Layer w4: R69.1@5748.18,3075 5806.29,3075 5857,3024.29 5857,2921.71 5870,2908.71 5920,2908.71 5928,2916.71 6006.86,2916.71 6023.52,2900.04 v1(6106.86,2900.04) ; R69.1@5751.94,3071.24 cw(c5761.02,3062.16) 5761.02,3075 cw(c5761.02,3087.84) R69.1@5751.94,3078.76 ; R69.1@5754.77,3068.41 cw(c5770.68,3052.5) 5770.68,3075 cw(c5770.68,3097.5) R69.1@5754.77,3081.59 ; v1@6100.14,2893.32 ccw(c6083.92,2877.11) 6083.92,2900.04 ccw(c6083.92,2922.98) v1@6100.14,2906.76 ; v1@6102.97,2896.15 ccw(c6093.58,2886.76) 6093.58,2900.04 ccw(c6093.58,2913.32) v1@6102.97,2903.93
DB_JTAG.HARD.TDI: R72.1 U30.T6 | length 2280.4
  Top Layer w4: v1(5813.86,2759.51) 5815.98,2759.51 5817.28,2760.81 5817.28,2762.72 5815,2765 5815,2766.9 5837.19,2744.71 5837.19,2727.62 5840.19,2724.62 5840.19,2715.04 5810,2684.85 5810,2530 5831.63,2508.37 v1(5881.86,2508.37) ; v1@5814,2758.02 cw(c5815.82,2738.85) 5829.43,2752.47 ; v1@5814.38,2754.04 cw(c5816.86,2727.88) 5835.44,2746.46 ; v1@5875.14,2501.66 ccw(c5858.92,2485.44) 5858.92,2508.37 ccw(c5858.92,2531.31) v1@5875.14,2515.09 ; v1@5877.97,2504.49 ccw(c5868.58,2495.1) 5868.58,2508.37 ccw(c5868.58,2521.65) v1@5877.97,2512.26
  Top Layer w8: v2@6773.78,2052.85 cw(c6773.78,2031.12) 6789.14,2046.49 cw(c6804.51,2061.85) v2@6782.78,2061.85 ; v2(6773.78,2061.85) U30.T6@6793.46,2042.17 ; U30.T6@6787.62,2042.17 ccw(c6773.52,2042.17) 6783.49,2052.14 ccw(c6793.46,2062.11) U30.T6@6793.46,2048.01
  Bottom Layer w4: R72.1@5741.59,2827.92 cw(c5725.68,2812.01) 5748.18,2812.01 cw(c5770.68,2812.01) R72.1@5754.77,2827.92 ; R72.1@5744.42,2830.75 cw(c5735.34,2821.67) 5748.18,2821.67 cw(c5761.02,2821.67) R72.1@5751.94,2830.75 ; R72.1@5748.18,2835 5748.18,2783.93 5768.81,2763.3 5796.18,2763.3 5799.97,2759.51 v1(5813.86,2759.51) v1@5815.98,2759.51 ; v1(5881.86,2508.37) 6115.19,2508.37 6131.86,2491.71 6131.86,2125.04 6148.52,2108.37 6340.19,2108.37 6431.86,2200.04 6745.86,2200.04 6754.19,2191.71 6754.19,2091.71 6770.86,2075.04 6773.78,2075.04 v2(6773.78,2061.85) ; v1@5885.75,2504.49 cw(c5895.14,2495.1) 5895.14,2508.37 cw(c5895.14,2521.65) v1@5885.75,2512.26 ; v1@5888.57,2501.66 cw(c5904.79,2485.44) 5904.79,2508.37 cw(c5904.79,2531.31) v1@5888.57,2515.09 ; 6755.6,2090.3 cw(c6728.55,2063.25) v2@6766.78,2062.07 ; 6762.14,2083.76 cw(c6741.24,2062.86) v2@6770.78,2061.94 ; 6768.68,2077.22 cw(c6753.92,2062.47) v2@6774.78,2061.82
DB_JTAG.HARD.TDO: R71.1 R73.1 U30.W2 | length 2916.6
  Top Layer w8: v2@6655.67,2210.33 cw(c6655.67,2188.6) 6671.03,2203.97 cw(c6686.4,2219.33) v2@6664.67,2219.33 ; v2(6655.67,2219.33) U30.W2@6675.35,2199.65 ; U30.W2@6669.51,2199.65 ccw(c6655.41,2199.65) 6665.38,2209.62 ccw(c6675.35,2219.59) U30.W2@6675.35,2205.49
  MidLayer1 w4: v1@5775.14,2943.32 cw(c5758.92,2927.11) 5781.86,2927.11 cw(c5804.79,2927.11) v1@5788.57,2943.32 ; v1@5777.97,2946.15 cw(c5768.58,2936.76) 5781.86,2936.76 cw(c5795.14,2936.76) v1@5785.75,2946.15 ; v1(5781.86,2950.04) 5781.86,2863.14 5810.79,2834.21 5839.36,2805.64 5839.36,2750.64 v4(5855,2735)
  MidLayer2 w4: v1@5775.14,2943.32 cw(c5758.92,2927.11) 5781.86,2927.11 cw(c5804.79,2927.11) v1@5788.57,2943.32 ; v1@5777.97,2946.15 cw(c5768.58,2936.76) 5781.86,2936.76 cw(c5795.14,2936.76) v1@5785.75,2946.15 ; v1(5781.86,2950.04) 5781.86,2890.71 5847.19,2825.37 6339.86,2825.37 6348.52,2816.71 6366.52,2816.71 6391.52,2841.71 6541.19,2841.71 6573.52,2809.37 6573.52,2375.04 v1(6556.86,2358.37) ; v1@6556.86,2363.87 ccw(c6556.86,2377.15) 6566.25,2367.76 ccw(c6575.64,2358.37) v1@6562.36,2358.37 ; v1@6556.86,2367.87 ccw(c6556.86,2390.81) 6573.08,2374.59 ccw(c6589.29,2358.37) v1@6566.36,2358.37
  Bottom Layer w4: R73.1@5547.24,2945.19 cw(c5547.24,2918) 5566.46,2937.23 ; R73.1@5547.24,2949.19 cw(c5547.24,2931.66) 5559.63,2944.05 ; R73.1@5547.24,2952.76 R73.1@5547.24,2955 ; R73.1@5548.07,2955.62 5603.65,2900.04 5747.92,2900.04 5777,2870.96 5777,2828.12 5756.86,2807.98 5756.86,2786.57 5772.13,2771.3 5793.25,2771.3 5805.98,2784.02 5836.56,2784.02 5855,2765.59 v4(5855,2735) ; R73.1@5556.56,2954.51 ccw(c5574.37,2954.51) 5561.77,2941.91 ; R71.1@5751.94,2951.24 cw(c5761.02,2942.16) 5761.02,2955 cw(c5761.02,2967.84) R71.1@5751.94,2958.76 ; R71.1@5754.77,2948.41 cw(c5770.68,2932.5) 5770.68,2955 cw(c5770.68,2977.5) R71.1@5754.77,2961.59 ; R71.1@5757.5,2955 cw(c5757.5,2926.91) v1@5777.87,2946.25 ; 5766.81,2955 cw(c5766.81,2935.75) v1@5780.77,2949.01 ; 5770.89,2955 ccw(c5770.89,2961) v1@5775.14,2956.76 ; v1@5774.97,2943.5 ccw(c5748.18,2918.06) R71.1@5748.18,2955 5770.9,2955 5775.86,2950.04 v1(5781.86,2950.04) ; v4@5848.06,2741.94 ccw(c5831.31,2758.69) 5855,2758.69 ccw(c5878.69,2758.69) v4@5861.94,2741.94 ; v4@5850.89,2739.11 ccw(c5840.97,2749.03) 5855,2749.03 ccw(c5869.03,2749.03) v4@5859.11,2739.11 ; v1@6552.02,2350.2 cw(c6546.99,2341.71) 6556.86,2341.71 ; v1(6556.86,2358.37) 6556.86,2341.71 ; v1@6561.7,2350.2 ccw(c6566.73,2341.71) 6556.86,2341.71 ; v2@6644.67,2219.33 ccw(c6618.11,2219.33) 6636.89,2238.11 ccw(c6655.67,2256.89) v2@6655.67,2230.33 ; v2@6648.67,2219.33 ccw(c6631.77,2219.33) 6643.72,2231.28 ccw(c6655.67,2243.23) v2@6655.67,2226.33 ; v2(6655.67,2219.33) 6636.52,2238.48 6636.52,2270.37 6606.86,2300.04 6598.52,2300.04 6556.86,2341.71
DB_JTAG.HARD.TMS: R68.1 U30.V1 | length 2156.6
  Top Layer w8: v2@6695.04,2249.7 cw(c6695.04,2227.97) 6710.4,2243.34 cw(c6725.77,2258.7) v2@6704.04,2258.7 ; v2(6695.04,2258.7) U30.V1@6714.72,2239.02 ; U30.V1@6708.88,2239.02 ccw(c6694.78,2239.02) 6704.75,2248.99 ccw(c6714.72,2258.96) U30.V1@6714.72,2244.86
  MidLayer2 w4: v1(5802.19,3200.71) 5865.19,3200.71 5982.52,3083.37 6325.19,3083.37 6341.86,3066.71 6373.29,3066.71 6485.63,2954.37 6720.21,2954.37 6774.86,2899.73 6774.86,2891.71 6774.86,2468.04 6765.19,2458.37 6732.86,2458.37 6665.19,2390.71 6665.19,2288.55 v2(6695.04,2258.7) ; v2@6684.04,2258.7 ccw(c6657.48,2258.7) 6676.26,2277.48 ccw(c6695.04,2296.26) v2@6695.04,2269.7 ; v2@6688.04,2258.7 ccw(c6671.14,2258.7) 6683.09,2270.65 ccw(c6695.04,2282.6) v2@6695.04,2265.7
  Bottom Layer w4: R68.1@5748.18,3195 5796.57,3195 5800.57,3199 5800.57,3199.08 v1(5802.19,3200.71) ; R68.1@5751.94,3191.24 cw(c5761.02,3182.16) 5761.02,3195 cw(c5761.02,3207.84) R68.1@5751.94,3198.76 ; R68.1@5754.77,3188.41 cw(c5770.68,3172.5) 5770.68,3195 cw(c5770.68,3217.5) R68.1@5754.77,3201.59 ; 5765.47,3195 ccw(c5765.47,3237.42) v1@5795.47,3207.43 ; 5775.13,3195 ccw(c5775.13,3227.77) v1@5798.3,3204.6 ; 5784.79,3195 ccw(c5784.79,3218.11) v1@5801.13,3201.77
DB_JTAG.SOFT.TCK: U8.AF14 U30.W9 | length 3888.8
  Top Layer w4: v1@5291.81,2781.76 ccw(c5275.59,2797.98) 5298.52,2797.98 ccw(c5321.46,2797.98) v1@5305.24,2781.76 ; v1@5294.64,2778.93 ccw(c5285.25,2788.32) 5298.52,2788.32 ccw(c5311.8,2788.32) v1@5302.41,2778.93 ; v1(5298.52,2775.04) 5298.52,2836.48 5285,2850 5285,2915 5311.15,2941.15 5338.89,2941.15 5357.81,2922.23 5372.57,2922.23 5383,2932.66 5383,2958.52 5423.52,2999.04 5423.52,3016.71 5415.19,3025.04 5415.19,3163.73 5390.19,3188.73 5390.19,3228.02 5398,3235.83 5398,3347.25 5392.5,3352.75 5392.5,3419.4 5364.7,3447.19 5364.7,3514.57 5390.19,3540.06 5390.19,3626.29 5409.69,3645.79 5409.69,3660 5409.69,3670 U8.AF14@5409.69,3697.87 ; U8.AF14@5404.38,3692.57 cw(c5391.58,3679.77) 5409.69,3679.77 cw(c5427.79,3679.77) U8.AF14@5414.99,3692.57 ; U8.AF14@5404.49,3692.68 cw(c5391.96,3680.15) 5409.69,3680.15 cw(c5427.41,3680.15) U8.AF14@5414.88,3692.68
  Top Layer w8: v2@6655.67,1934.74 cw(c6655.67,1913.01) 6671.03,1928.38 cw(c6686.4,1943.74) v2@6664.67,1943.74 ; v2(6655.67,1943.74) U30.W9@6675.35,1924.06 ; U30.W9@6669.51,1924.06 ccw(c6655.41,1924.06) 6665.38,1934.03 ccw(c6675.35,1944) U30.W9@6675.35,1929.9
  MidLayer1 w4: v1@5264.02,1925.04 ccw(c5241.09,1925.04) 5257.31,1941.26 ccw(c5273.52,1957.48) v1@5273.52,1934.54 ; v1@5268.02,1925.04 ccw(c5254.75,1925.04) 5264.14,1934.43 ccw(c5273.52,1943.82) v1@5273.52,1930.54 ; v1(5273.52,1925.04) 5208.4,1990.16 5208.4,2448.61 5273.81,2514.01 5273.81,2705.29 5298.52,2730 v1(5298.52,2775.04) ; v1@5291.81,2768.32 cw(c5275.59,2752.11) 5298.52,2752.11 cw(c5321.46,2752.11) v1@5305.24,2768.32 ; v1@5294.64,2771.15 cw(c5285.25,2761.76) 5298.52,2761.76 cw(c5311.8,2761.76) v1@5302.41,2771.15
  MidLayer2 w4: v1@5273.52,1915.54 cw(c5273.52,1892.61) 5289.74,1908.82 cw(c5305.96,1925.04) v1@5283.02,1925.04 ; v1@5273.52,1919.54 cw(c5273.52,1906.26) 5282.91,1915.65 cw(c5292.3,1925.04) v1@5279.02,1925.04 ; v1(5273.52,1925.04) 5316.7,1881.87 5747.27,1881.87 5766.28,1900.87 5792.68,1900.87 5841.51,1949.71 6302.54,1949.71 6328.54,1923.71 6637.52,1923.71 6655.52,1941.71 6655.67,1941.71 v2(6655.67,1943.74) ; 6638.47,1924.65 ccw(c6623.01,1940.11) v2@6644.74,1942.52 ; 6640.11,1926.3 cw(c6655.67,1910.74) v2@6655.67,1932.74 ; 6644.35,1930.54 ccw(c6633.6,1941.29) v2@6648.71,1942.97 ; 6646.94,1933.12 cw(c6655.67,1924.4) v2@6655.67,1936.74
DB_JTAG.SOFT.TDI: U8.AA19 U30.T4 | length 3088
  Top Layer w4: U8.AA19@5606.54,3887.22 cw(c5606.54,3869.12) 5619.34,3881.92 cw(c5632.14,3894.72) U8.AA19@5614.04,3894.72 ; U8.AA19@5606.54,3887.38 cw(c5606.54,3869.66) 5619.07,3882.19 cw(c5631.6,3894.72) U8.AA19@5613.88,3894.72 ; U8.AA19@5606.54,3894.72 v3(5626.22,3875.04) ; 5613.42,3887.84 cw(c5600.61,3875.04) 5618.72,3875.04 ccw(c5600.61,3875.04) 5613.42,3887.84 ; 5613.42,3887.84 ccw(c5626.22,3900.65) 5626.22,3882.54 cw(c5626.22,3900.65) 5613.42,3887.84
  Top Layer w8: v2@6773.78,2131.59 cw(c6773.78,2109.86) 6789.14,2125.23 cw(c6804.51,2140.59) v2@6782.78,2140.59 ; v2(6773.78,2140.59) U30.T4@6793.46,2120.91 ; U30.T4@6787.62,2120.91 ccw(c6773.52,2120.91) 6783.49,2130.88 ccw(c6793.46,2140.85) U30.T4@6793.46,2126.75
  MidLayer1 w4: v3@5625.57,3867.57 cw(c5623.99,3849.53) 5637.86,3861.17 ; v3@5633.69,3874.39 ccw(c5651.73,3872.81) 5637.86,3861.17 ; 5650.08,3798.23 5650.08,3812.16 ; v1@5908.47,2418.32 ccw(c5892.26,2402.11) 5892.26,2425.04 ccw(c5892.26,2447.98) v1@5908.47,2431.76 ; v1@5911.3,2421.15 ccw(c5901.91,2411.76) 5901.91,2425.04 ccw(c5901.91,2438.32) v1@5911.3,2428.93 ; v1(5915.19,2425.04) 5819.96,2425.04 5806.86,2438.14 5806.86,2653.71 5748.36,2712.21 5748.36,2896.13 5739.88,2904.6 5700.19,2944.29 5700.19,3316.33 5672.19,3344.33 5672.19,3393.35 5698.52,3419.69 5698.52,3485.75 5690.19,3494.08 5690.19,3500.04 5650.08,3540.15 5650.08,3660 5650.08,3670 5650.08,3718.62 5650.08,3738.04 5650.08,3812.16 ; 5637.86,3861.17 cw(c5608.35,3831.66) 5650.08,3831.66 5650.08,3812.16
  MidLayer2 w4: v1@5915.19,2415.54 cw(c5915.19,2392.61) 5931.41,2408.82 cw(c5947.63,2425.04) v1@5924.69,2425.04 ; v1@5915.19,2419.54 cw(c5915.19,2406.26) 5924.58,2415.65 cw(c5933.97,2425.04) v1@5920.69,2425.04 ; v1(5915.19,2425.04) 5940.19,2400.04 5940.19,2341.71 6023.52,2258.37 6306.86,2258.37 6365.19,2200.04 6370.86,2194.37 6424.45,2194.37 6459.27,2159.55 6498.45,2120.37 6748.52,2120.37 6765.19,2137.04 6765.19,2141.71 v2@6773.78,2141.71 ; 6753.23,2125.08 cw(c6773.78,2104.52) v2@6773.78,2133.59 ; 6758.57,2130.42 ccw(c6748.39,2140.59) v2@6762.78,2140.59 ; 6760.05,2131.91 cw(c6773.78,2118.18) v2@6773.78,2137.59
DB_JTAG.SOFT.TDO: U8.AC20 U30.T3 | length 3636.6
  Top Layer w4: U8.AC20@5645.91,3808.48 cw(c5645.91,3790.38) 5658.71,3803.18 cw(c5671.51,3815.98) U8.AC20@5653.41,3815.98 ; U8.AC20@5645.91,3808.64 cw(c5645.91,3790.92) 5658.44,3803.45 cw(c5670.97,3815.98) U8.AC20@5653.25,3815.98 ; U8.AC20@5645.91,3815.98 v3(5665.59,3796.3) ; v1(5831.86,2616.71) 5880.19,2665.04 v1(5880.19,2783.37) ; v1@5831.86,2622.21 ccw(c5831.86,2635.49) 5841.25,2626.1 ccw(c5850.64,2616.71) v1@5837.36,2616.71 ; v1@5831.86,2626.21 ccw(c5831.86,2649.14) 5848.07,2632.93 ccw(c5864.29,2616.71) v1@5841.36,2616.71 ; v1@5873.47,2776.66 cw(c5857.26,2760.44) 5880.19,2760.44 cw(c5903.13,2760.44) v1@5886.91,2776.66 ; v1@5876.3,2779.49 cw(c5866.91,2770.1) 5880.19,2770.1 cw(c5893.47,2770.1) v1@5884.08,2779.49 ; v1(6573.52,2283.37) 6623.37,2283.37 6640.04,2300.04 v1(6692.86,2300.04) ; v1@6577.41,2279.49 cw(c6586.8,2270.1) 6586.8,2283.37 cw(c6586.8,2296.65) v1@6577.41,2287.26 ; v1@6580.24,2276.66 cw(c6596.46,2260.44) 6596.46,2283.37 cw(c6596.46,2306.31) v1@6580.24,2290.09 ; v1@6686.14,2293.32 ccw(c6669.92,2277.11) 6669.92,2300.04 ccw(c6669.92,2322.98) v1@6686.14,2306.76 ; v1@6688.97,2296.15 ccw(c6679.58,2286.76) 6679.58,2300.04 ccw(c6679.58,2313.32) v1@6688.97,2303.93 ; 5652.79,3809.1 cw(c5639.98,3796.3) 5658.09,3796.3 ccw(c5639.98,3796.3) 5652.79,3809.1 ; 5652.79,3809.1 ccw(c5665.59,3821.91) 5665.59,3803.8 cw(c5665.59,3821.91) 5652.79,3809.1
  Top Layer w8: v2@6773.78,2170.96 cw(c6773.78,2149.23) 6789.14,2164.6 cw(c6804.51,2179.96) v2@6782.78,2179.96 ; v2(6773.78,2179.96) U30.T3@6793.46,2160.28 ; U30.T3@6787.62,2160.28 ccw(c6773.52,2160.28) 6783.49,2170.25 ccw(c6793.46,2180.22) U30.T3@6793.46,2166.12
  MidLayer1 w4: v3@5660.4,3791.11 cw(c5647.86,3778.57) 5665.59,3778.57 cw(c5683.32,3778.57) v3@5670.78,3791.11 ; v3(5665.59,3796.3) 5665.59,3718.62 5665.59,3670 5665.59,3660 5665.59,3610.73 5658.08,3603.23 5658.08,3543.46 5698.52,3503.02 5698.52,3497.06 5706.86,3488.73 5706.86,3416.71 5681.86,3391.71 5681.86,3375.71 5688.05,3369.52 5697.38,3369.52 5709.61,3357.29 5709.61,3334.61 5708.19,3333.19 5708.19,2947.61 5756.86,2898.94 5756.86,2715.02 5815.19,2656.69 5815.19,2633.37 v1(5831.86,2616.71) ; v1@5822.36,2616.71 ccw(c5799.42,2616.71) 5815.64,2632.93 ccw(c5831.86,2649.14) v1@5831.86,2626.21 ; v1@5826.36,2616.71 ccw(c5813.08,2616.71) 5822.47,2626.1 ccw(c5831.86,2635.49) v1@5831.86,2622.21 ; 5665.59,3778.19 cw(c5683.7,3778.19) 5670.89,3791 ccw(c5683.7,3778.19) 5665.59,3778.19 ; 5665.59,3778.19 ccw(c5647.48,3778.19) 5660.29,3791 cw(c5647.48,3778.19) 5665.59,3778.19
  MidLayer2 w4: v1(5880.19,2783.37) 5880.19,2769.75 6008.23,2641.71 6306.86,2641.71 6440.19,2508.37 6440.19,2450.04 6523.52,2366.71 6523.52,2341.71 6540.19,2325.04 6565.19,2325.04 6585.15,2345 6613.52,2345 6623.52,2335 6623.52,2317.04 6589.86,2283.37 ; v1(6573.52,2283.37) 6589.86,2283.37 ; v1@6581.78,2278.68 cw(c6589.86,2274.09) 6589.86,2283.37 ; v1@6581.78,2288.07 ccw(c6589.86,2292.66) 6589.86,2283.37
  Bottom Layer w4: v1@6690.42,2300.58 ccw(c6704.05,2297.59) 6694.18,2287.72 ; v1(6692.86,2300.04) 6692.86,2289.04 6715.19,2266.71 6715.19,2247.37 6723.52,2239.04 6741.86,2239.04 6753.52,2227.37 6753.52,2212.37 6779.86,2186.04 6781.86,2184.04 6781.86,2179.96 v2(6773.78,2179.96) ; v1@6694.32,2299.72 ccw(c6712.53,2295.73) 6699.35,2282.55 ; v1@6698.23,2298.86 ccw(c6721.01,2293.87) 6704.52,2277.38 ; v1@6702.14,2298.01 ccw(c6729.49,2292.01) 6709.69,2272.21 ; 6754.06,2211.84 cw(c6723.33,2181.1) v2@6766.78,2180.12 ; 6760.68,2205.22 cw(c6736.27,2180.81) v2@6770.78,2180.03 ; 6767.29,2198.6 cw(c6749.21,2180.52) v2@6774.78,2179.94
DB_JTAG.SOFT.TMS: U8.AB20 U30.T2 | length 3225.4
  Top Layer w4: U8.AB20@5645.91,3847.85 cw(c5645.91,3829.75) 5658.71,3842.55 cw(c5671.51,3855.35) U8.AB20@5653.41,3855.35 ; U8.AB20@5645.91,3848.01 cw(c5645.91,3830.29) 5658.44,3842.82 cw(c5670.97,3855.35) U8.AB20@5653.25,3855.35 ; U8.AB20@5645.91,3855.35 v3(5665.59,3835.67) ; 5652.79,3848.47 cw(c5639.98,3835.67) 5658.09,3835.67 ccw(c5639.98,3835.67) 5652.79,3848.47 ; 5652.79,3848.47 ccw(c5665.59,3861.28) 5665.59,3843.17 cw(c5665.59,3861.28) 5652.79,3848.47
  Top Layer w8: v2@6773.78,2210.33 cw(c6773.78,2188.6) 6789.14,2203.97 cw(c6804.51,2219.33) v2@6782.78,2219.33 ; v2(6773.78,2219.33) U30.T2@6793.46,2199.65 ; U30.T2@6787.62,2199.65 ccw(c6773.52,2199.65) 6783.49,2209.62 ccw(c6793.46,2219.59) U30.T2@6793.46,2205.49
  MidLayer1 w4: v3@5664.94,3828.2 cw(c5663.36,3810.16) 5677.23,3821.8 cw(c5691.1,3833.44) v3@5673.06,3835.02 ; 5676.99,3822.09 cw(c5667.05,3812.16) 5681.1,3812.16 5681.1,3718.62 5681.1,3670 5681.1,3660 5681.1,3633.47 5688.64,3625.93 5731.86,3582.71 5731.86,3550.71 5773.52,3509.04 5865.54,3509.04 5895,3479.58 5915.19,3459.4 5915.19,3350.04 5957.86,3307.37 5962,3303.23 5962,3282.5 5948.52,3269.02 5948.52,3258.37 5914.19,3224.04 5914.19,3034.37 5934.19,3014.37 5934.19,2935.71 5906.86,2908.37 5906.86,2837.36 5898.52,2829.02 5898.52,2801.1 5905.69,2793.94 5905.69,2772.81 5898.52,2765.65 5898.52,2642.32 5973.52,2567.32 5973.52,2491.71 6131.86,2333.37 v1(6165.19,2333.37) ; v1@6158.47,2326.66 ccw(c6142.26,2310.44) 6142.26,2333.37 ccw(c6142.26,2356.31) v1@6158.47,2340.09 ; v1@6161.3,2329.49 ccw(c6151.91,2320.1) 6151.91,2333.37 ccw(c6151.91,2346.65) v1@6161.3,2337.26
  Bottom Layer w4: v1@6158.47,2326.66 cw(c6142.26,2310.44) 6165.19,2310.44 cw(c6188.13,2310.44) v1@6171.91,2326.66 ; v1@6161.3,2329.49 cw(c6151.91,2320.1) 6165.19,2320.1 cw(c6178.47,2320.1) v1@6169.08,2329.49 ; v1(6165.19,2333.37) 6165.19,2266.71 6306.86,2125.04 6331.86,2125.04 6390.19,2183.37 6390.19,2216.71 6549.52,2376.04 6648.48,2376.04 6746.94,2277.59 6754.52,2270 6754.52,2250 6754.52,2241.71 v2@6776.9,2219.33 ; 6752.96,2243.27 cw(c6729.27,2219.57) v2@6762.78,2219.39 ; 6759.74,2236.49 cw(c6742.75,2219.5) v2@6766.78,2219.37 ; 6760.33,2235.9 ccw(c6773.78,2249.35) v2@6773.78,2230.33 ; v2(6773.78,2219.33) v2@6776.9,2219.33 ; v2@6776.9,2219.33 6781.86,2219.33 6781.86,2216.71 6779.52,2216.71 v2@6776.9,2219.33
DB_MEM.BUS_A1: U7.E2 U8.AD15 U61.82 | length 6240.3
  Top Layer w4: v1@5435,3444.62 v1(5435,3440) 5460,3465 5460,3495 ; v1@5435,3445.5 ccw(c5435,3458.78) 5444.39,3449.39 ccw(c5453.78,3440) v1@5440.5,3440 ; v1@5435,3449.5 ccw(c5435,3472.43) 5451.22,3456.22 ccw(c5467.43,3440) v1@5444.5,3440 ; U8.AD15@5449.06,3769.27 cw(c5449.06,3751.55) 5461.59,3764.08 ; U8.AD15@5456.4,3776.61 ccw(c5474.12,3776.61) 5461.59,3764.08 ; 5460,3466.77 5460,3495 ; U61.82@5960.87,2821.32 cw(c5950.45,2810.89) 5965.19,2810.89 ; U61.82@5962.33,2854.29 ccw(c5960.84,2858.37) 5965.19,2858.37 ; U61.82@5963.7,2850.53 cw(c5979.04,2850.53) 5968.19,2861.38 ; 5965.19,2818.09 cw(c5969.76,2818.09) U61.82@5966.53,2821.32 ; U61.82@5965.19,2837.34 5965.19,2775.04 5981.86,2758.37 5998.52,2758.37 6073.52,2683.37 6120.54,2683.37 6170.54,2733.37 6206.86,2733.37 6240.19,2766.71 6240.19,2780.37 6261.52,2801.71 ; U61.82@5965.19,2838.83 5965.19,2858.37 ; 5965.19,2856.59 ccw(c5969.76,2856.59) U61.82@5966.53,2853.36 ; U61.82@5967.7,2850.53 cw(c5992.7,2850.53) v1@5975.02,2868.21 ; v1@5972.36,2875.04 cw(c5949.42,2875.04) 5965.64,2858.82 cw(c5981.86,2842.61) v1@5981.86,2865.54 ; v1@5976.36,2875.04 cw(c5963.08,2875.04) 5972.47,2865.65 cw(c5981.86,2856.26) v1@5981.86,2869.54 ; v1(5981.86,2875.04) 5965.19,2858.37 ; v1@6272.51,2796.12 ccw(c6261.52,2788.12) 6261.52,2801.71 ; v1@6272.51,2807.3 cw(c6261.52,2815.29) 6261.52,2801.71 ; v1(6280.19,2801.71) 6261.52,2801.71 ; 5460,3495 5460,3503.45 5473.52,3516.97 5473.52,3651.25 5472.91,3651.25 5472.92,3655.26 5472.92,3660 5472.92,3670 5472.92,3736.73 ccw(c5434.24,3736.73) 5461.59,3764.08
  Top Layer w8: v2@7810.63,4594.11 cw(c7810.63,4572.38) 7825.99,4587.75 cw(c7841.36,4603.11) v2@7819.63,4603.11 ; v2(7810.63,4603.11) U7.E2@7830.32,4583.43 ; U7.E2@7824.32,4583.43 ccw(c7809.83,4583.43) 7820.07,4593.67 ccw(c7830.32,4603.91) U7.E2@7830.32,4589.43
  MidLayer1 w4: v1(7752.19,3241.71) 7740.19,3253.71 7740.19,3600.67 7799.19,3659.67 7799.19,4187.34 7840.19,4228.34 7840.19,4573.55 v2(7810.63,4603.11) ; v2@7810.63,4592.11 cw(c7810.63,4565.56) 7829.41,4584.33 cw(c7848.19,4603.11) v2@7821.63,4603.11 ; v2@7810.63,4596.11 cw(c7810.63,4579.21) 7822.58,4591.16 cw(c7834.53,4603.11) v2@7817.63,4603.11
  MidLayer2 w4: v1@5428.28,3433.28 cw(c5412.06,3417.06) 5435,3417.06 cw(c5457.93,3417.06) v1@5441.72,3433.28 ; v1@5431.11,3436.11 cw(c5421.72,3426.72) 5435,3426.72 cw(c5448.28,3426.72) v1@5438.89,3436.11 ; v1@5440.19,3439.86 5440.05,3440 v1(5435,3440) 5435,3382.21 5445,3372.21 5445,3336.02 5432.43,3323.44 5432.43,3308.94 5443,3298.37 5456.86,3298.37 5466.19,3289.04 5469.19,3286.04 5469.19,3251.67 5439.86,3222.34 5439.86,3190 5439.86,3090 5439.86,3065.04 5471.53,3033.37 5548.52,3033.37 5840.19,3033.37 5981.86,2891.71 ; v1@5977.02,2883.22 ccw(c5971.99,2891.71) 5981.86,2891.71 ; v1(5981.86,2875.04) 5981.86,2891.71 ; v1@5986.7,2883.22 cw(c5991.73,2891.71) 5981.86,2891.71
  Bottom Layer w4: v1(6280.19,2801.71) 6292.52,2789.37 6423.52,2789.37 6425.86,2791.71 6668.29,2791.71 6676.58,2800 6725,2800 6834.84,2800.04 ; 6834.8,2800 6834.84,2800.04 ; v1(7752.19,3241.71) 7823.52,3241.71 7840.19,3225.04 7840.19,3091.71 7823.52,3075.04 7800,3075.04 7740.91,3134.13 7635.87,3134.13 7610.54,3159.46 7514.11,3159.46 7315.19,3358.37 7215.19,3358.37 7198.52,3341.71 7198.52,3308.37 7245,3261.9 7245,3096.52 7156.86,3008.37 7023.52,2875.04 6909.84,2875.04 6834.84,2800.04 ; v1@7756.08,3237.82 cw(c7765.47,3228.43) 7765.47,3241.71 cw(c7765.47,3254.99) v1@7756.08,3245.6 ; v1@7758.91,3234.99 cw(c7775.13,3218.77) 7775.13,3241.71 cw(c7775.13,3264.64) v1@7758.91,3248.43